# Altium PCB 856_Mez.PcbDoc
Units mm, origin at the board's own origin, x right, y up, seen from the top; angles counter-clockwise.
Board outline 78 x 78 mm, 2 copper layers (Top Layer, Bottom Layer); 6 components, 15 nets, 94 pads, 120 vias.
Unrouted connection lines stored in the file: 6.
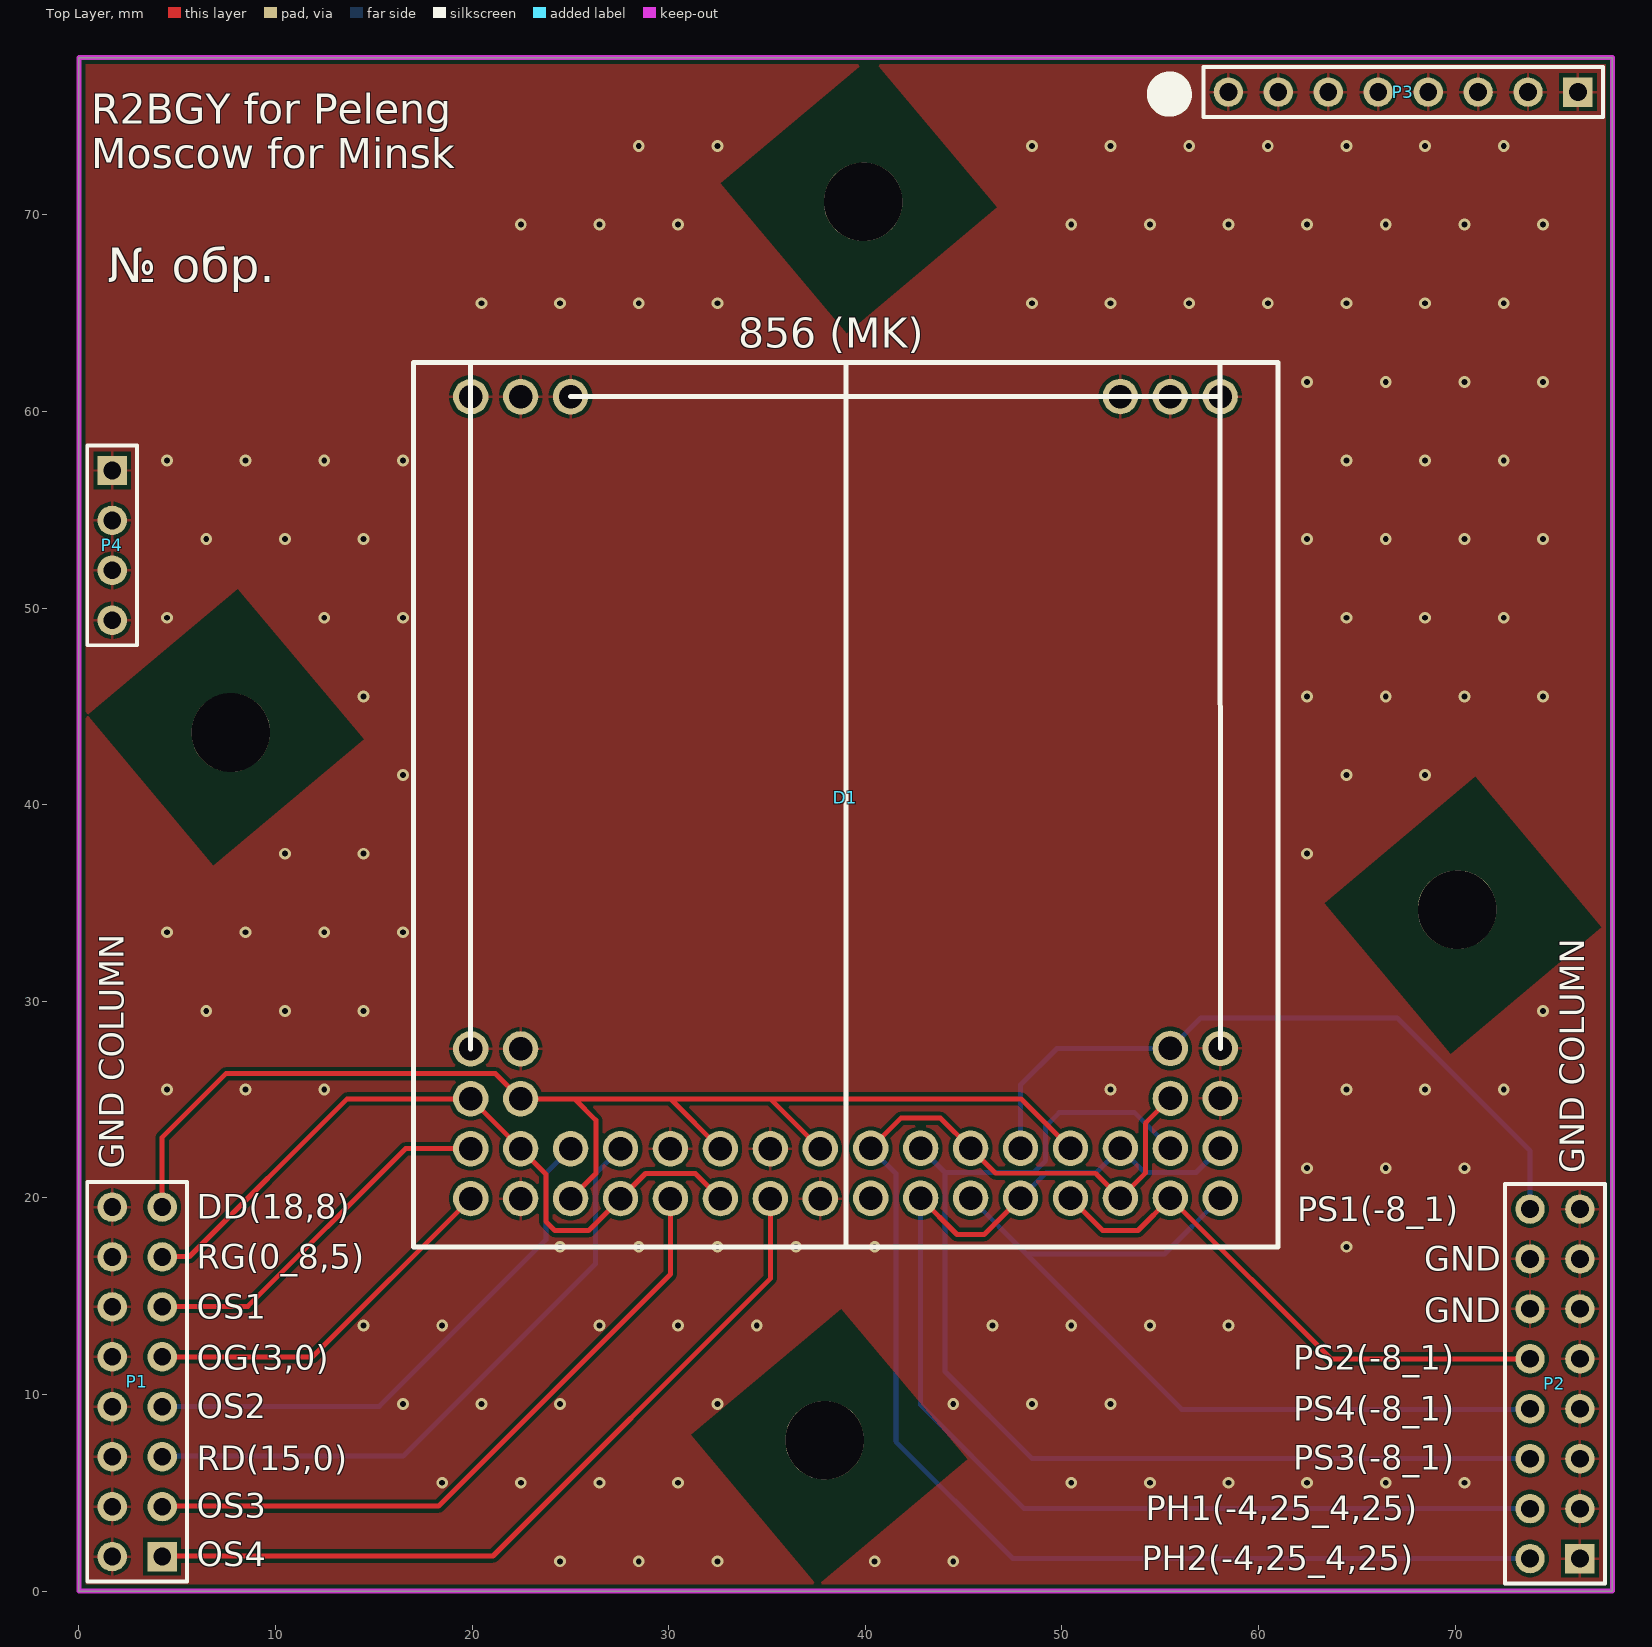
[diagram p0: Top Layer view]
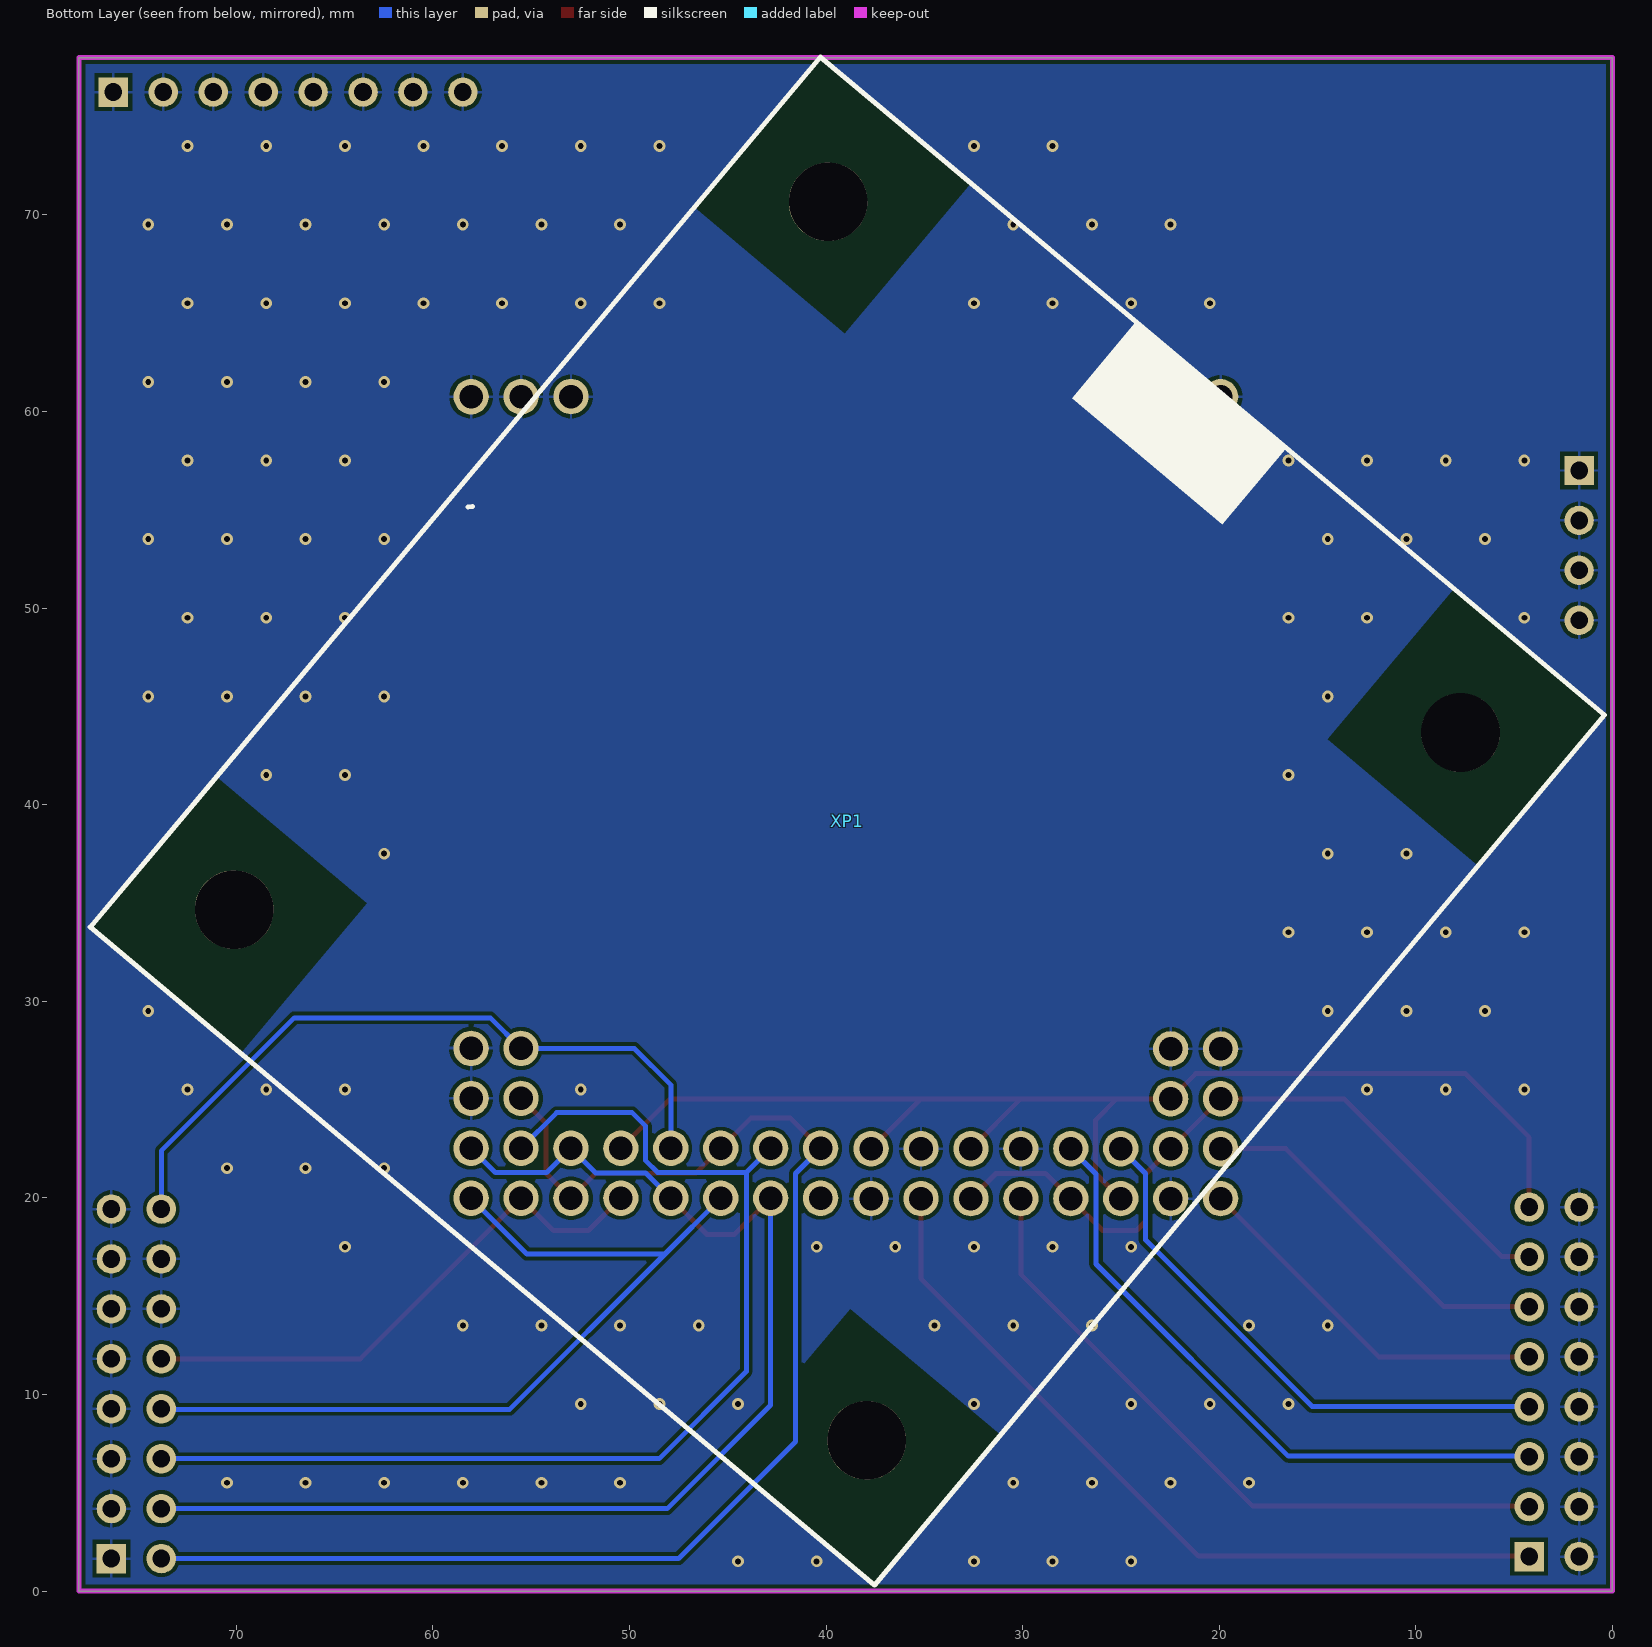
[diagram p1: Bottom Layer view, seen from below]

## Layer stack, top to bottom
Top Solder: solder mask 0.0102, Solder Resist, Dk 3.5
Top Layer: signal copper 0.0356
Dielectric 1: dielectric 0.32, FR-4, Dk 4.8
Bottom Layer: signal copper 0.0356
Bottom Solder: solder mask 0.0102, Solder Resist, Dk 3.5

## Board outline
0,0 78,0 78,78 0,78

## Design rules (kind name [scope] priority, off if disabled: settings)
BoardOutlineClearance [OnLayer('Multi-Layer')] p1: gap=0.254 ignorepadtopadclearanceinfootprint=FALSE except(0: Arc-SplitContinuation Track-SplitContinuation SMDPad-SplitContinuation THPad-SplitContinuation Via-SplitContinuation Fill-SplitContinuation Poly-SplitContinuation Region-SplitContinuation Text-SplitContinuation; 0.4: Arc-OutlineEdge Track-OutlineEdge SMDPad-OutlineEdge THPad-OutlineEdge Via-OutlineEdge Fill-OutlineEdge Poly-OutlineEdge Region-OutlineEdge Text-OutlineEdge)
Clearance [All] p1: gap=0.125 ignorepadtopadclearanceinfootprint=FALSE except(0.2: Arc-Fill Arc-Poly Track-Fill Track-Poly SMDPad-Fill SMDPad-Poly THPad-Fill THPad-Poly Via-Fill Via-Poly Fill-Fill Fill-Poly Poly-Poly Poly-Region Poly-Text; 0.25: Arc-Hole Track-Hole SMDPad-Hole THPad-Hole Via-Hole Fill-Hole Poly-Hole Region-Hole Text-Hole) // Standart
DiffPairsRouting [All] p1: maxlimit=0.254 minlimit=0.127 mostfreqgap=0.13 toplayer_minwidth=0.127 toplayer_maxwidth=0.381 toplayer_prefwidth=0.37 bottomlayer_minwidth=0.127 bottomlayer_maxwidth=0.381 bottomlayer_prefwidth=0.37 maxuncoupledlength=12.7
HoleSize [All] p1: absolutevalues=TRUE maxlimit=5 minlimit=0.3 maxpercent=80.000 minpercent=20.000
MinimumSolderMaskSliver [All] p1: minsoldermaskwidth=0.1
PlaneClearance "PlaneClearance-1 1/2 Oz" [All] p1: clearance=0.2 // Standart
PlaneConnect "TermalConnect-1 1/2 Oz" [All] p1: planeconnectstyle=Relief reliefexpansion=0.2 reliefentries=4 reliefconductorwidth=0.2 reliefairgap=0.2 // Standart
PolygonConnect "PolygonConnect-1 1/2 Oz" [All] p1: thpad.connectstyle=Relief thpad.reliefconductorwidth=0.15 thpad.reliefentries=4 thpad.polygonreliefangle="90 Angle" thpad.airgapwidth=0.2 smdpad.connectstyle=Relief smdpad.reliefconductorwidth=0.2 smdpad.reliefentries=4 smdpad.polygonreliefangle="90 Angle" smdpad.airgapwidth=0.2 via.connectstyle=Direct via.reliefconductorwidth=0.254 via.reliefentries=4 via.polygonreliefangle="90 Angle" via.airgapwidth=0.254 // Standart
RoutingVias [All] p1: holewidth=0.3 width=1.27 viastyle="Through Hole" minholewidth=0.3 minwidth=0.6 maxholewidth=0.711 maxwidth=1.27
SilkToSilkClearance [All] p1: silktosilkclearance=0
SilkToSolderMaskClearance [IsPad] p1: minsilkscreentomaskgap=0 clearancetoexposedcopper=TRUE
SolderMaskExpansion [All] p1: expansion=0.102 istentingtop=FALSE
UnRoutedNet [All] p1: checkbadconnections=TRUE
Width [All] p1: maxlimit=2.5 minlimit=0.125 preferedwidth=0.37
22 further rules are at their usual default settings.

## Components (designator, comment, footprint, x,y, rotation, side; value= is the part's Value field where it differs from the comment)
D1 "856 (MK)" Dzr_place 17.006,17.496 r0 top
P1 "Header 8X2" HDR2X8 4.23,1.753 r90 top
P2 "Header 8X2" HDR2X8 76.352,1.651 r90 top
P3 "Header 8" HDR1X8 76.251,76.251 r180 top
P4 "Header 4" HDR1X4 1.69,57 r270 top
XP1 "Грелка" Грелка 38.913,39.167 r310 bottom

## Footprints (in the part's own frame and the unit in brackets; to place one, negate y for a bottom-side part, rotate by r counter-clockwise, add the part's x,y. Pads: shape width x height; smd on the part's side, far side on the other; paste and mask are expansions set on the pad)
Dzr_place [mm]
  round 1.8 hole 1.2: P1(41.05,10.105) P2(38.51,10.105) P15(5.461,10.084) P16(2.921,10.084) R1(41.05,7.565) R2(38.51,7.565) R15(5.461,7.544) R16(2.921,7.544) S1(41.05,5.025) S2(38.51,5.025) S3(35.97,5.025) S4(33.43,5.025) S5(30.89,5.025) S6(28.35,5.025) S7(25.81,5.025) S8(23.27,5.025) S9(20.701,5.004) S10(18.161,5.004) S11(15.621,5.004) S12(13.081,5.004) S13(10.541,5.004) S14(8.001,5.004) S15(5.461,5.004) S16(2.921,5.004) T1(41.05,2.485) T2(38.51,2.485) T3(35.97,2.485) T4(33.43,2.485) T5(30.89,2.485) T6(28.35,2.485) T7(25.81,2.485) T8(23.27,2.485) T9(20.701,2.464) T10(18.161,2.464) T11(15.621,2.464) T12(13.081,2.464) T13(10.541,2.464) T14(8.001,2.464) T15(5.461,2.464) T16(2.921,2.464) ""(2.921,43.256) ""(5.461,43.256) ""(8.001,43.256) ""(35.966,43.265) ""(38.506,43.256) ""(41.046,43.256)
  silkscreen extent 0,0 44,45.01
HDR1X4 [mm] "Connector; Header; 4 Position"
  rect 1.5x1.5 hole 0.9: 1(0,0)
  round 1.5 hole 0.9: 2(2.54,0) 3(5.08,0) 4(7.62,0)
  silkscreen extent -1.27,-1.27 8.89,1.27
HDR1X8 [mm] "Connector; Header; 8 Position"
  rect 1.5x1.5 hole 0.9: 1(0,0)
  round 1.5 hole 0.9: 2(2.54,0) 3(5.08,0) 4(7.62,0) 5(10.16,0) 6(12.7,0) 7(15.24,0) 8(17.78,0)
  silkscreen extent -1.27,-1.27 19.05,1.27
HDR2X8 [mm] "Connector; Header; 8x2 Position"
  rect 1.5x1.5 hole 0.9: 1(0,0)
  round 1.5 hole 0.9: 2(0,2.54) 3(2.54,0) 4(2.54,2.54) 5(5.08,0) 6(5.08,2.54) 7(7.62,0) 8(7.62,2.54) 9(10.16,0) 10(10.16,2.54) 11(12.7,0) 12(12.7,2.54) 13(15.24,0) 14(15.24,2.54) 15(17.78,0) 16(17.78,2.54)
  silkscreen extent -1.27,-1.27 19.05,3.81
Грелка [mm]
  round 4 hole 4 unplated: 0(-23.5,21) 0(-23.5,-21) 0(23.5,-21) 0(23.5,21)
  silkscreen extent -28.89,-26.03 28.89,26.03

## Part data
D1: library part Б856А-3
P1 P2: "Header, 8-Pin, Dual row", LatestRevisionDate=17-Jul-2002, LatestRevisionNote="Re-released for DXP Platform.", Publisher="Altium Limited"
P3: "Header, 8-Pin", LatestRevisionDate=17-Jul-2002, LatestRevisionNote="Re-released for DXP Platform.", Publisher="Altium Limited"
P4: "Header, 4-Pin", LatestRevisionDate=17-Jul-2002, LatestRevisionNote="Re-released for DXP Platform.", Publisher="Altium Limited"

## Via types
v1: diameter 0.6, hole 0.3, Top Layer to Bottom Layer, 120 vias

## Nets (pads, with @x,y where several pads share a name; then routed paths per layer and width w, separated by ;. In a path a pad name is that pad's centre, name@x,y a point inside that pad or via, vN(x,y) a via of type N, cw(c..) or ccw(c..) an arc to the next point about the centre after c; other vN are vias at no path point)
2V: D1.T16 P1.9 | length 19
  Top Layer w0.254: P1.9 11.88,11.913 D1.T16
14.5V: D1.S13 P1.5 | length 32.5
  Bottom Layer w0.254: P1.5@4.23,6.858 16.485,6.858 26.264,16.637 26.264,21.216 D1.S13
18.5V: D1.R15 D1.S4 D1.S9 D1.S11 D1.T14 P1.15 | length 65.9
  Top Layer w0.254: P1.15 4.23,23.074 7.47,26.314 21.192,26.314 D1.R15 25.202,25.039 ; D1.T14 26.289,21.242 26.289,23.952 25.202,25.039 ; D1.S11 30.087,25.039 ; D1.S9 35.167,25.039 ; D1.S4 47.917,25.039 35.167,25.039 ; 25.202,25.039 30.087,25.039 ; 30.087,25.039 35.167,25.039
GND: D1. D1.P1 D1.P15 D1.P16 D1.R1 D1.S10 D1.S12 D1.T9 D1.T15 P1.2 P1.4 P1.6 P1.8 P1.10 P1.12 P1.14 P1.16 P2.1 P2.3 P2.5 P2.7 P2.9 P2.11 P2.12 P2.13 P2.14 P2.15 P3.1 P3.2 P3.3 P3.4 P3.5 P3.6 P3.7 P3.8 P4.1 P4.2 P4.3 P4.4
  other v1: 24.476,1.509 28.476,1.509 32.476,1.509 40.476,1.509 44.476,1.509 18.476,5.509 22.476,5.509 26.476,5.509 30.476,5.509 50.476,5.509 54.476,5.509 58.476,5.509 62.476,5.509 66.476,5.509 70.476,5.509 16.476,9.509 20.476,9.509 24.476,9.509 32.476,9.509 44.476,9.509 48.476,9.509 52.476,9.509 14.476,13.509 18.476,13.509 26.476,13.509 30.476,13.509 34.476,13.509 46.476,13.509 50.476,13.509 54.476,13.509 58.476,13.509 24.476,17.509 28.476,17.509 32.476,17.509 36.476,17.509 40.476,17.509 64.476,17.509 62.476,21.509 66.476,21.509 70.476,21.509 4.476,25.509 8.476,25.509 12.476,25.509 52.476,25.509 64.476,25.509 68.476,25.509 72.476,25.509 6.476,29.509 10.476,29.509 14.476,29.509 74.476,29.509 4.476,33.509 8.476,33.509 12.476,33.509 16.476,33.509 10.476,37.509 14.476,37.509 62.476,37.509 16.476,41.509 64.476,41.509 68.476,41.509 14.476,45.509 62.476,45.509 66.476,45.509 70.476,45.509 74.476,45.509 4.476,49.509 12.476,49.509 16.476,49.509 64.476,49.509 68.476,49.509 72.476,49.509 6.476,53.509 10.476,53.509 14.476,53.509 62.476,53.509 66.476,53.509 70.476,53.509 74.476,53.509 4.476,57.509 8.476,57.509 12.476,57.509 16.476,57.509 64.476,57.509 68.476,57.509 72.476,57.509 62.476,61.509 66.476,61.509 70.476,61.509 74.476,61.509 20.476,65.509 24.476,65.509 28.476,65.509 32.476,65.509 48.476,65.509 52.476,65.509 56.476,65.509 60.476,65.509 64.476,65.509 68.476,65.509 72.476,65.509 22.476,69.509 26.476,69.509 30.476,69.509 50.476,69.509 54.476,69.509 58.476,69.509 62.476,69.509 66.476,69.509 70.476,69.509 74.476,69.509 28.476,73.509 32.476,73.509 48.476,73.509 52.476,73.509 56.476,73.509 60.476,73.509 64.476,73.509 68.476,73.509 72.476,73.509
OS1: D1.S16 P1.11 | length 19
  Top Layer w0.254: P1.11@4.23,14.478 8.585,14.478 16.607,22.499 D1.S16
OS2: D1.S14 P1.7 | length 28.2
  Bottom Layer w0.254: P1.7@4.23,9.398 15.281,9.398 23.749,17.866 23.749,21.242 D1.S14
OS3: D1.T12 P1.3 | length 34.6
  Top Layer w0.254: P1.3@4.23,4.318 18.288,4.318 30.087,16.117 D1.T12
OS4: D1.T10 P1.1 | length 40.9
  Top Layer w0.254: P1.1@4.23,1.778 21.057,1.778 35.167,15.888 D1.T10
PH11: D1.S1 D1.S3 D1.T5 D1.T7 P2.4 | length 62.5
  Top Layer w0.254: D1.T7 44.661,18.136 46.05,18.136 D1.T5
  Bottom Layer w0.254: D1.T7 42.816,9.458 48.082,4.191 P2.4 ; D1.T5 49.174,21.26 51.714,21.26 D1.S3 54.211,21.285 56.82,21.285 D1.S1
PH21: D1.R2 D1.S6 D1.S8 D1.T3 P2.2 | length 71.3
  Top Layer w0.254: D1.S8 41.808,24.054 43.823,24.054 D1.S6 46.626,21.251 51.706,21.251 D1.T3 54.246,21.251 54.246,23.791 D1.R2
  Bottom Layer w0.254: D1.S8 41.554,21.242 41.554,7.595 47.498,1.651 P2.2
PS1: D1.P2 D1.S5 P2.16 | length 36.3
  Bottom Layer w0.254: D1.S5 47.896,25.747 49.75,27.601 D1.P2 57.074,29.159 67.046,29.159 73.812,22.393 P2.16
PS2: D1.T2 D1.T4 P2.10 | length 28.1
  Top Layer w0.254: D1.T4 52.078,18.339 53.873,18.339 D1.T2 63.686,11.811 P2.10
PS3: D1.S2 D1.S7 P2.6 | length 58
  Bottom Layer w0.254: D1.S7 44.051,21.285 ; D1.S2 53.703,24.333 49.86,24.333 49.174,23.647 49.174,21.895 48.565,21.285 44.051,21.285 ; P2.6 48.489,6.731 44.051,11.168 44.051,21.285
PS4: D1.T1 D1.T6 P2.8 | length 43.9
  Bottom Layer w0.254: D1.T6 48.192,17.145 ; D1.T1 55.22,17.145 48.192,17.145 ; P2.8@73.812,9.246 56.091,9.246 48.192,17.145
RG: D1.R16 D1.S15 D1.T11 D1.T13 P1.13 | length 37.6
  Top Layer w0.254: P1.13@4.23,17.018 5.624,17.018 13.645,25.039 D1.R16 D1.S15 23.749,21.217 23.749,18.796 24.206,18.339 25.926,18.339 D1.T13 28.822,21.234 31.352,21.234 D1.T11
pads on no net: D1.T8 XP1.0

## Polygon pours and split planes (outlines as drawn)
GND on Top Layer "Top Overlay-No Net" (solid, remove dead copper, pour order 0): 0,0 78,0 78,78 0,78
GND on Bottom Layer "Top Overlay-No Net" (solid, remove dead copper, pour order 1): 0,78 0,0 78,0 78,78

## Keep-outs
Keep-Out Layer:
  the board outline again, w0.254

## Other copper
Multi-Layer:
  pour cut-out: 8.072,50.991 14.5,43.331 6.839,36.903 0.412,44.563
  pour cut-out: 40.279,78.042 46.707,70.382 39.047,63.954 32.619,71.614
  pour cut-out: 71.02,41.424 77.448,33.763 69.787,27.336 63.359,34.996
  pour cut-out: 38.774,14.368 45.202,6.707 37.541,0.279 31.113,7.94

## Silkscreen, mask and mechanical layers (free items; w line width, h text height)
Top Overlay:
  lines w1.5: 55.853,76.276 ccw(c55.474,76.149) 55.874,76.149
  text "R2BGY for Peleng / Moscow for Minsk" at 0.613,72.365 h1.52
  text "№ обр." at 1.463,66.001 h3
  text "GND COLUMN" at 2.283,21.479 h1.25 r90
  text "GND COLUMN" at 76.577,21.254 h1.25 r90
  text "DD(18,8)" at 5.991,18.945 h1.25
  text "PS1(-8_1)" at 61.965,18.812 h1.25
  text "RG(0_8,5)" at 5.991,16.395 h1.25
  text "GND" at 68.422,16.279 h1.25
  text "OS1" at 5.991,13.854 h1.25
  text "GND" at 68.422,13.679 h1.25
  text "OG(3,0)" at 5.983,11.262 h1.25
  text "PS2(-8_1)" at 61.757,11.262 h1.25
  text "OS2" at 5.991,8.779 h1.25
  text "PS4(-8_1)" at 61.757,8.662 h1.25
  text "PS3(-8_1)" at 61.757,6.162 h1.25
  text "RD(15,0)" at 5.983,6.132 h1.25
  text "OS3" at 5.991,3.721 h1.25
  text "PH1(-4,25_4,25)" at 54.26,3.596 h1.25
  text "OS4" at 5.991,1.254 h1.25
  text "PH2(-4,25_4,25)" at 54.06,1.046 h1.25